# Altium PCB SOM_PCB_BLUETECHNIX.PcbDoc (part 8 of 8)
Units mil, origin at the board's own origin, x right, y up, seen from the top; angles counter-clockwise.
Board outline 1225 x 1620 mil, 8 copper layers (Top Layer, Int1 (Sign), Int2 (GND), Int3 (Sign), Int4 (Sign), Int5 (PWR), Int6 (Sign), Bottom Layer), stack 66.2 mil thick; 65 components, 201 nets, 938 pads, 497 vias.
Unrouted connection lines stored in the file: 25.
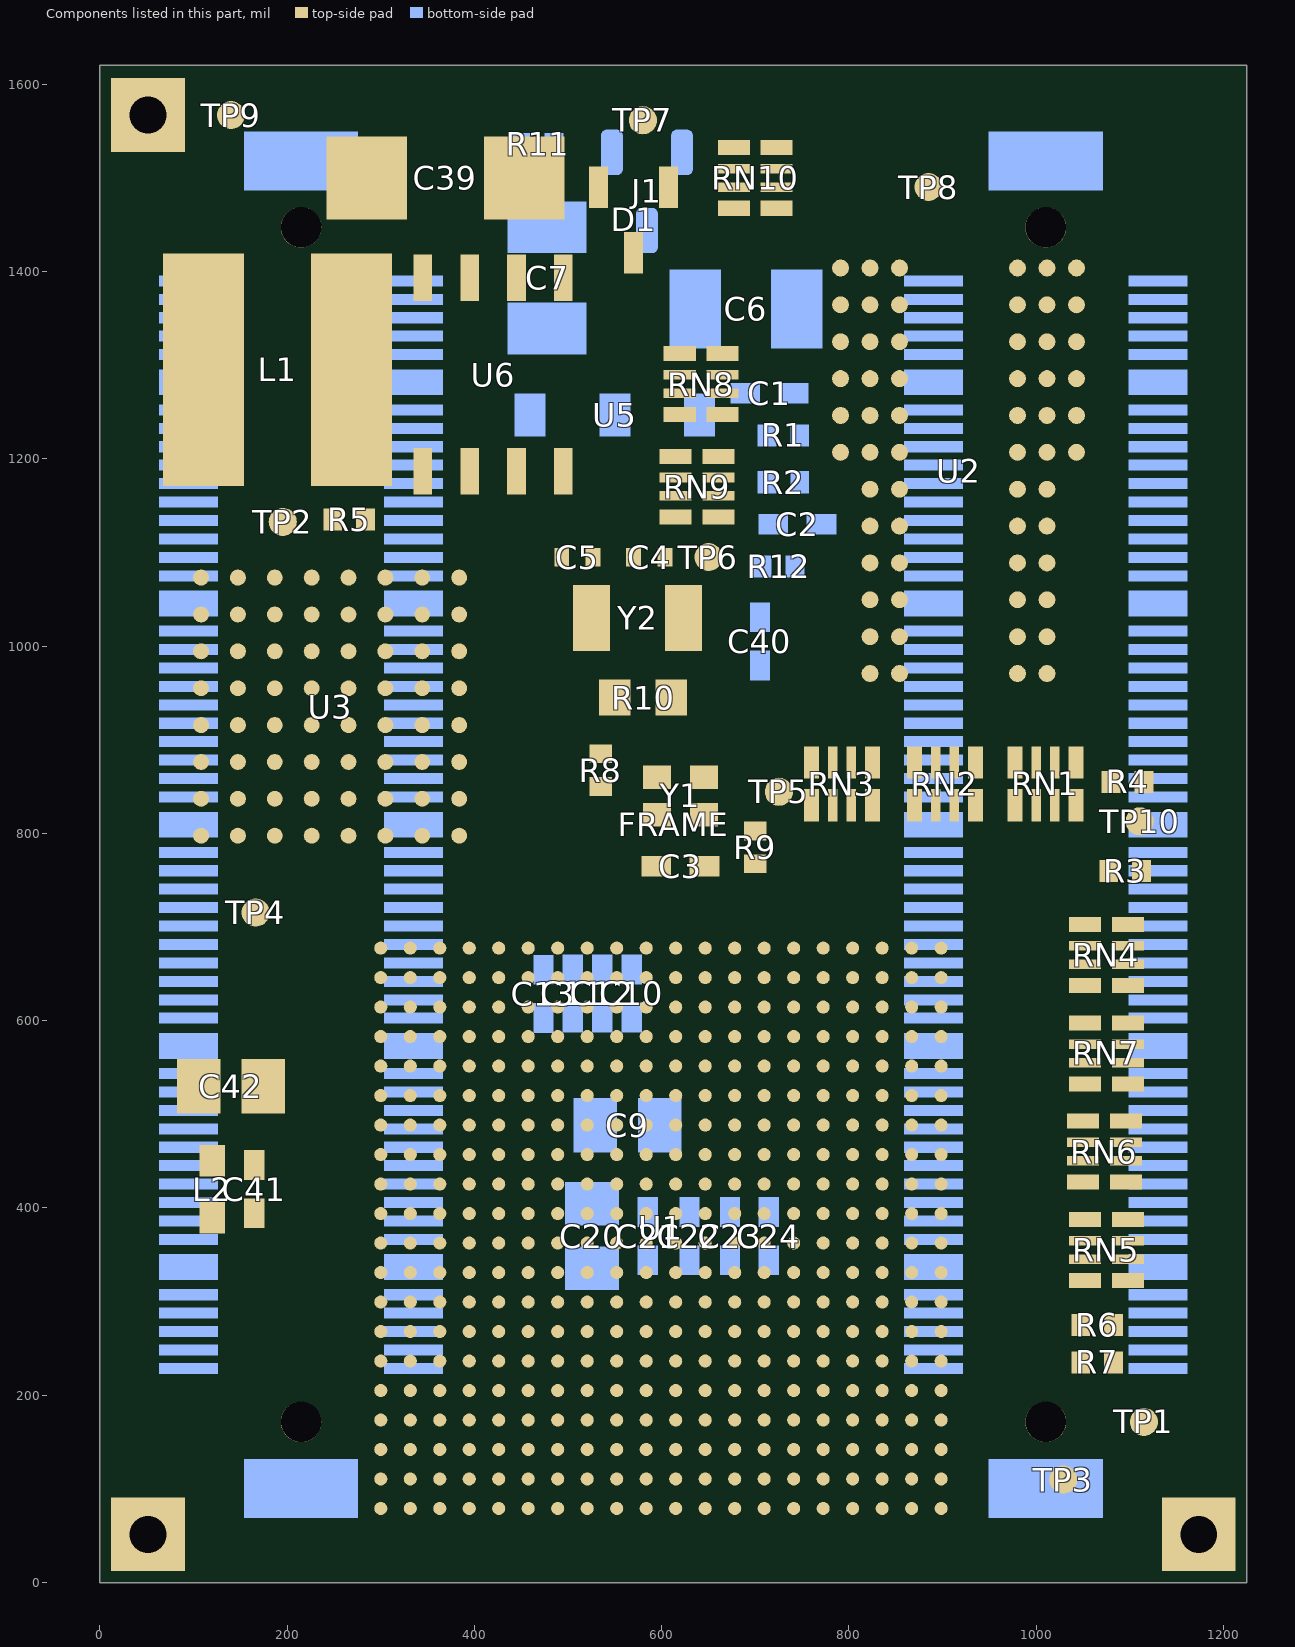
[diagram p13: the components of this part, seen from the top]

## Silkscreen, mask and mechanical layers (free items; w line width, h text height) (continued)
Mechanical 6:
  drawing of 1233 lines, arcs and shapes, not listed
  text "SOM" at -2729.09,10377.81 h49.21
  text "DESIGN INFORMATION" at -4943.23,10377.05 h49.21
  text "BOARD NAME:" at -3463.23,10377.05 h49.21
  text "BOARD TECHNOLOGY" at -4943.23,10277.05 h49.21
  text "BOARD SIZE (REFER ALSO PROFILING INFORMATION)" at -3043.23,10277.05 h49.21
  text "3mil" at -4859.72,10190.88 h49.21
  text "15mil" at -4321.22,10184.07 h49.21
  text "(mm)" at -1460,10181 h49.21
  text "3mil" at -3771.22,10179.07 h49.21
  text "31" at -2752,10176 h49.21
  text "41" at -1962,10176 h49.21
  text "X" at -2308.23,10157.05 h49.21
  text "(MIN. TRACK/   PADS  /   CLEARANCE  IN 0.001'')" at -5003.23,10077.05 h49.21
  text "MINIMUM ANNULAR RING 0.05MM (0.002'') EXTERNAL PER IPC-2221 CLASS 3 LEVEL C AND IS THE" at -4943.23,9977.06 h49.21
  text "MANUFACTURING REGISTRATION ALLOWANCE" at -4943.23,9887.05 h49.21
  text "LAND SIZE CALCULATION MINIMUM - NOMINAL HOLE SIZE + 0.508MM (0.020'')" at -4943.23,9777.05 h49.21
  text "8" at -1271.46,9604.36 h49.21
  text "CIRCUIT TYPE:" at -4943.23,9597.05 h49.21
  text "SS" at -4043.23,9597.05 h49.21
  text "DS" at -3343.23,9597.05 h49.21
  text "X" at -2768.23,9597.05 h49.21
  text "PTH" at -2643.23,9597.05 h49.21
  text "ML" at -2213.23,9597.05 h49.21
  text "X" at -2063.23,9597.05 h49.21
  text "No. of Layers" at -1943.23,9597.05 h49.21
  text "FINGER CONNECTOR DIM PER:" at -4943.23,9477.05 h49.21
  text "AS SHOWN" at -1943.23,9477.05 h49.21
  text "No. OFF TOTAL" at -4283.23,9367.05 h49.21
  text "ONE SIDE" at -2643.23,9367.05 h49.21
  text "BOTH SIDES" at -1943.23,9357.05 h49.21
  text "X" at -3466.38,9255.99 h49.21
  text "X" at -2761.38,9255.99 h49.21
  text "VIAS:" at -4943.23,9252.05 h49.21
  text "NONE" at -4493.23,9252.05 h49.21
  text "FEED THRU'" at -4043.23,9252.05 h49.21
  text "TENTED" at -3343.23,9252.05 h49.21
  text "BURIED LAYER" at -2643.23,9252.05 h49.21
  text "UNIQUE DRILL" at -4043.23,9132.05 h49.21
  text "2 SIZE" at -3343.23,9132.05 h49.21
  text "BLIND LAYER SEQUENCE" at -2643.23,9132.05 h49.21
  text "Layer Stack Manager (PCB)" at -3548.23,9042.05 h49.21
  text "X" at -2063.23,9042.05 h49.21
  text "AS SHOWN" at -1943.23,9042.05 h49.21
  text "LAYER CONSTRUCTION PER:" at -4943.23,9037.05 h49.21
  text "Altium Designer 21" at -1949.57,8932.34 h49.21
  text "ARTWORK:" at -4943.23,8927.05 h49.21
  text "MANUAL" at -4043.23,8927.05 h49.21
  text "DIGITISED" at -3343.23,8927.05 h49.21
  text "X" at -2763.23,8927.05 h49.21
  text "CAD" at -2643.23,8927.05 h49.21
  text "TYPE" at -2213.23,8927.05 h49.21
  text "BURIED LAYER SEQUENCE" at -4933.23,8597.05 h49.21
  text "[1-2], [1-2],[1-3],[1-4],[1-5],[1-6],[1-7],[1-8],[8-7],[8-6],[8-5],[8-4],[8-3],[8-2]" at -4935,8330 h49.21
  text "MATERIAL:" at -4943.23,6236.39 h49.21
  text "GLASS FIBRE EPOXY RESIN NEMA GRADE FR4-08 (IPC-4101) - WITH TG170" at -3933.23,6226.39 h49.21
  text "X" at -4038.23,6221.39 h49.21
  text "THICKNESS:" at -4633.23,6111.39 h49.21
  text "0.8mm" at -3933.23,6111.39 h49.21
  text "1.2mm" at -3238.23,6111.39 h49.21
  text "1.6mm" at -2543.24,6111.41 h49.21
  text "2.4mm" at -1843.23,6111.39 h49.21
  text "3.2mm" at -1143.23,6111.39 h49.21
  text "X" at -2638.23,6106.39 h49.21
  text "2" at -2789.76,5997.42 h49.21
  text "TOLERANCE:" at -4638.23,5991.39 h49.21
  text "OTHER +/-" at -1843.23,5991.39 h49.21
  text "X" at -4038.23,5986.39 h49.21
  text "IN A/W IPC-D-300G CLASS" at -3911.73,5983.52 h49.21
  text "2" at -2789.76,5875.37 h49.21
  text "BOW & TWIST:" at -4638.74,5871.39 h49.21
  text "AS SHOWN" at -1838.23,5866.39 h49.21
  text "IN A/W IPC-D-300G CLASS" at -3911.73,5863.52 h49.21
  text "X" at -4038.23,5861.39 h49.21
  text "COPPER THICKNESS (FINISHED)" at -4734.65,5753.32 h49.21
  text "X" at -2962.06,5656.84 h49.21
  text "X" at -1937.06,5651.84 h49.21
  text "18um" at -3933.23,5651.39 h49.21
  text "35um" at -2868.23,5651.39 h49.21
  text "70um" at -1833.23,5651.39 h49.21
  text "OUTER:" at -4592.91,5647.02 h49.21
  text "INNER SIGNAL:" at -4734.65,5536.79 h49.21
  text "18um" at -3933.23,5531.39 h49.21
  text "35um" at -2868.23,5531.39 h49.21
  text "70um" at -1833.23,5531.39 h49.21
  text "X" at -2971,5528 h49.21
  text "INNER PWR:" at -4592.91,5410.8 h49.21
  text "18um" at -3933.23,5411.39 h49.21
  text "35um" at -2868.23,5411.39 h49.21
  text "70um" at -1833.23,5411.39 h49.21
  text "X" at -2971,5410 h49.21
  text "STRUCTURE:" at -4943.23,5291.39 h49.21
  text "REFER" at -3933.23,5291.39 h49.21
  text "AS PER DRAWING No." at -3938.23,5166.39 h49.21
  text "AS SHOWN" at -1838.23,5166.39 h49.21
  text "DRILLING:" at -4943.23,5056.39 h49.21
  text "COMPONENT SIDE" at -3933.23,4966.39 h49.21
  text "SOLDER SIDE" at -2878.23,4966.39 h49.21
  text "VIEWED FROM:" at -4667.72,4958.05 h49.21
  text "X" at -4038.23,4956.39 h49.21
  text "REFERENCE:" at -4658.23,4846.39 h49.21
  text "AS SHOWN" at -3938.23,4841.39 h49.21
  text "PATTERN MASTER LIST" at -2873.23,4841.39 h49.21
  text "X" at -1938.23,4841.39 h49.21
  text "NC_DRILL FILES" at -1838.23,4841.39 h49.21
  text "X" at -4038.23,4836.39 h49.21
  text "20um" at -2868.23,4726.39 h49.21
  text "PTH MINIMUM COPPER THICKNESS:" at -4655.91,4721.83 h49.21
  text "X" at -2973.23,4721.39 h49.21
  text "OTHER" at -1838.23,4721.39 h49.21
  text "NPTH:" at -4659.84,4607.65 h49.21
  text "TENTED" at -3938.23,4601.39 h49.21
  text "X" at -2973.23,4601.39 h49.21
  text "PADS REMOVED" at -2873.23,4601.39 h49.21
  text "REMOVE PADS" at -1838.23,4601.39 h49.21
  text "X" at -4038.23,4596.39 h49.21
  text "2nd DRILL" at -3938.23,4481.39 h49.21
  text "BOTH" at -2873.23,4481.39 h49.21
  text "AS SHOWN" at -2388.23,4481.39 h49.21
  text "NONE" at -1838.23,4481.39 h49.21
  text "BOARD FINISH:" at -4943.23,4366.39 h49.21
  text "X" at -4038.23,4361.39 h49.21
  text "ETCHING" at -3938.23,4361.39 h49.21
  text "REFER PATTERN MASTER LIST" at -2873.23,4361.39 h49.21
  text "LEGEND / SCREEN PRINT:" at -4927.13,4250 h49.21
  text "NONE" at -3604.65,4245.76 h49.21
  text "COMPONENT" at -2873.35,4244.39 h49.21
  text "SOLDER" at -1836.93,4241.83 h49.21
  text "X" at -2973.35,4239.39 h49.21
  text "X" at -1936.93,4236.83 h49.21
  text "WHITE" at -3935.35,4131.59 h49.21
  text "COLOUR:" at -4459.06,4127.34 h49.21
  text "X" at -4035.35,4126.59 h49.21
  text "YELLOW" at -2873.23,4121.39 h49.21
  text "OTHER" at -1838.23,4121.39 h49.21
  text "SOLDER RESIST:" at -4699.21,4001.35 h49.21
  text "X" at -4038.23,4001.39 h49.21
  text "LIQUID PHOTOIMAGEABLE" at -3938.23,4001.39 h49.21
  text "SCREEN PRINT" at -2388.23,4001.39 h49.21
  text "FINISH:" at -4447.24,3883.24 h49.21
  text "MATTE" at -3938.23,3881.39 h49.21
  text "GLOSS" at -3438.23,3881.39 h49.21
  text "X" at -3543.23,3876.39 h49.21
  text "COLOUR:" at -4459.06,3765.13 h49.21
  text "BLACK" at -3938.23,3761.39 h49.21
  text "GREEN" at -3438.23,3761.39 h49.21
  text "YELLOW" at -2873.23,3761.39 h49.21
  text "BLUE" at -2388.23,3761.39 h49.21
  text "OTHER" at -1838.23,3761.39 h49.21
  text "X" at -4043.23,3756.39 h49.21
  text "TRACK FINISH:" at -4943.23,3646.39 h49.21
  text "SELECTIVE SOLDER (HASL)" at -3938.23,3641.39 h49.21
  text "REFLOW SOLDER" at -2388.23,3641.39 h49.21
  text "0.1um - 0.2um ELECTROLESS GOLD OVER 3um NICKEL" at -3935.43,3528.91 h49.21
  text "X" at -4037.8,3524.98 h49.21
  text "IMMERSION GOLD" at -3938.23,3401.39 h49.21
  text "OTHER" at -2388.23,3401.39 h49.21
  text "EDGE BOARD" at -4943.23,3286.39 h49.21
  text "1.3um HARD GOLD OVER 5um     NICKEL / TIN-NICKEL" at -3938.23,3281.39 h49.21
  text "CONTACTS:" at -4943.23,3201.39 h49.21
  text "HARD FINISH GOLDE PLATE" at -3938.23,3161.39 h49.21
  text "OTHER" at -2388.23,3161.39 h49.21
  text "AS SHOWN" at -3938.23,3041.39 h49.21
  text "REFER" at -2388.23,3041.39 h49.21
  text "PROFILING:" at -4943.23,2921.39 h49.21
  text "AS DIMENSIONED, MEASURED AND CUT FROM SPECIFIED DATUM." at -3938.23,2921.39 h49.21
  text "X" at -4038.23,2916.39 h49.21
  text "REFER PCB BLANK DWG No." at -3933.23,2806.39 h49.21
  text "USE PROFILE / ROUTE TAPE SUPPLIED (REFER PATTERN MASTER LIST)" at -3933.23,2686.39 h49.21
  text "Layer" at 1767.5,2570 h60
  text "Name" at 2177.41,2570 h60
  text "Material" at 3507.03,2570 h60
  text "Thickness" at 4066.89,2570 h60
  text "Constant" at 4716.73,2570 h60
  text "Board Layer Stack" at 5286.59,2570 h60
  text "X" at -2644.09,2568.28 h49.21
  text "SQUARE CUT" at -3933.23,2566.39 h49.21
  text "N.C. ROUTE" at -3233.23,2566.39 h49.21
  text "V. SCORE" at -2533.23,2566.39 h49.21
  text "BLANK" at -1833.23,2566.39 h49.21
  text "ACCEPTABILITY:" at -4943.23,2461.39 h49.21
  text "MATERIALS AND WORKMANSHIP FOR ALL PRINTED WIRING BOARDS TO MEET" at -4068.23,2456.39 h49.21
  text "Top Overlay" at 2177.41,2450 h60
  text "OR EXCEED THE REQUIREMENTS OF:" at -4068.23,2346.39 h49.21
  text "Top Solder" at 2177.41,2330 h60
  text "SM-001" at 3507.03,2330 h60
  text "1.00mil" at 4066.89,2330 h60
  text "4" at 4716.73,2330 h60
  text "IPC-6011/12 AND IPC-A-600E" at -3928.23,2241.39 h49.21
  text "1" at -2528.23,2241.39 h49.21
  text "2" at -2178.23,2241.39 h49.21
  text "3" at -1827.99,2238.95 h49.21
  text "X" at -2283.23,2236.39 h49.21
  text "X" at -4033.23,2231.39 h49.21
  text "Top Surface Finish" at 2177.41,2210 h60
  text "PbSn" at 3507.03,2210 h60
  text "0.79mil" at 4066.89,2210 h60
  text "UL CERTIFICATION" at -3928.23,2121.39 h49.21
  text "AUSTEL" at -2528.23,2121.39 h49.21
  text "X" at -4033.23,2116.39 h49.21
  text "1" at 1767.5,2090 h60
  text "Top Layer" at 2177.41,2090 h60
  text "CF-004" at 3507.03,2090 h60
  text "1.40mil" at 4066.89,2090 h60
  text "ML-P-55110F GRP" at -3948.23,2001.39 h49.21
  text "A" at -3228.23,2001.39 h49.21
  text "B" at -2878.23,2001.39 h49.21
  text "AS2546" at -2528.23,2001.39 h49.21
  text "OTHER" at -1828.23,2001.39 h49.21
  text "Dielectric 1" at 2177.41,1970 h60
  text "FR4" at 3507.03,1970 h60
  text "7.00mil" at 4066.89,1970 h60
  text "4.8" at 4716.73,1970 h60
  text "ADDITIONAL REQUIREMENTS:" at -4951.18,1871.43 h49.21
  text "2" at 1767.5,1850 h60
  text "Int1 (Sign)" at 2177.41,1850 h60
  text "CF-004" at 3507.03,1850 h60
  text "1.40mil" at 4066.89,1850 h60
  text "NONE" at -3929.57,1769.94 h49.21
  text "SAMPLE PLAN" at -3229.57,1769.94 h49.21
  text "MIL-P-55110E SERIAL Nos. PER ORDER" at -2450.83,1769.94 h49.21
  text "X" at -4035.83,1769.35 h49.21
  text "MICROSECTION:" at -4746.46,1765.13 h49.21
  text "Dielectric 3" at 2177.41,1730 h60
  text "FR4" at 3507.03,1730 h60
  text "9.00mil" at 4066.89,1730 h60
  text "4.8" at 4716.73,1730 h60
  text "NONE" at -3925.83,1644.42 h49.21
  text "CERTIFICATION:" at -4750.39,1639.15 h49.21
  text "A" at -2452.64,1635.25 h49.21
  text "MIL-P-55110E GRP" at -3233.9,1633.28 h49.21
  text "B" at -2241.38,1632.14 h49.21
  text "1" at -1268.94,1628.2 h49.21
  text "2" at -1057.68,1625.09 h49.21
  text "3" at -841.14,1625.09 h49.21
  text "IPC CLASS:" at -1836.26,1621.47 h49.21
  text "3" at 1767.5,1610 h60
  text "Int2 (GND)" at 2177.41,1610 h60
  text "CF-004" at 3507.03,1610 h60
  text "1.40mil" at 4066.89,1610 h60
  text "RoHS Compliant" at -3925.83,1518.44 h49.21
  text "X" at -4035.83,1513.44 h49.21
  text "X" at -3337.48,1509.94 h49.21
  text "QUALITY RELEASE REPORT" at -3233.9,1507.3 h49.21
  text "OTHER" at -1832.17,1505.33 h49.21
  text "Dielectric 4" at 2177.41,1490 h60
  text "FR4" at 3507.03,1490 h60
  text "7.00mil" at 4066.89,1490 h60
  text "4.8" at 4716.73,1490 h60
  text "NONE" at -3927.99,1391.98 h49.21
  text "REQUIRED (100% PADS & NETS)" at -3227.99,1391.98 h49.21
  text "PER ORDER" at -1824.06,1388.05 h49.21
  text "ELECTRICAL TEST:" at -4750.39,1387.18 h49.21
  text "X" at -3332.99,1386.98 h49.21
  text "4" at 1767.5,1370 h60
  text "Int3 (Sign)" at 2177.41,1370 h60
  text "CF-004" at 3507.03,1370 h60
  text "1.40mil" at 4066.89,1370 h60
  text "2 SIDES" at -2465.16,1266.51 h49.21
  text "MIN. PITCH" at -1831.93,1266.51 h49.21
  text "0.6mm" at -1296.93,1266.51 h49.21
  text "NONE" at -3927.99,1266 h49.21
  text "1 SIDE" at -3232.99,1266 h49.21
  text "SURFACE MOUNT:" at -4754.33,1261.2 h49.21
  text "X" at -2553.15,1258.52 h49.21
  text "Dielectric 6" at 2177.41,1250 h60
  text "FR4" at 3507.03,1250 h60
  text "9.00mil" at 4066.89,1250 h60
  text "4.8" at 4716.73,1250 h60
  text "FOIL" at -2449.25,1142.38 h49.21
  text "Bottom Overlay" at -1313.15,1138.99 h49.21
  text "NONE" at -3227.99,1138.44 h49.21
  text "LEGEND" at -2105.55,1138.44 h49.21
  text "REFER" at -1632.99,1138.44 h49.21
  text "X" at -3326.5,1136.91 h49.21
  text "X" at -1739.06,1136.91 h49.21
  text "5" at 1767.5,1130 h60
  text "Int4 (Sign)" at 2177.41,1130 h60
  text "CF-004" at 3507.03,1130 h60
  text "1.40mil" at 4066.89,1130 h60
  text "MANUFACTURER'S ID/LOGO:" at -4754.33,1127.34 h49.21
  text "NONE" at -2447.24,1017.1 h49.21
  text "ISO9001/AS3901" at -3227.2,1010.09 h49.21
  text "Dielectric 8" at 2177.41,1010 h60
  text "FR4" at 3507.03,1010 h60
  text "7.00mil" at 4066.89,1010 h60
  text "4.8" at 4716.73,1010 h60
  text "MANUFACTURER'S ACCREDITATION:" at -4754.33,1005.29 h49.21
  text "X" at -3332.2,1005.09 h49.21
  text "PACKAGING AND HANDLING:" at -4754.33,895.06 h49.21
  text "6" at 1767.5,890 h60
  text "Int5 (PWR)" at 2177.41,890 h60
  text "CF-004" at 3507.03,890 h60
  text "1.40mil" at 4066.89,890 h60
  text "REFER" at -2449.25,886.63 h49.21
  text "PER ORDER" at -3227.99,882.69 h49.21
  text "X" at -3332.99,872.69 h49.21
  text "Dielectric 9" at 2177.41,770 h60
  text "FR4" at 3507.03,770 h60
  text "9.00mil" at 4066.89,770 h60
  text "4.8" at 4716.73,770 h60
  text "7" at 1767.5,650 h60
  text "Int6 (Sign)" at 2177.41,650 h60
  text "CF-004" at 3507.03,650 h60
  text "1.40mil" at 4066.89,650 h60
  text "Notes" at -5053.54,580.09 h49.21
  text "Dielectric 11" at 2177.41,530 h60
  text "FR4" at 3507.03,530 h60
  text "7.00mil" at 4066.89,530 h60
  text "4.8" at 4716.73,530 h60
  text "8" at 1767.5,410 h60
  text "Bottom Layer" at 2177.41,410 h60
  text "CF-004" at 3507.03,410 h60
  text "1.40mil" at 4066.89,410 h60
  text "1.Dimensions are in mm except specifically specified as mil." at -4987.8,350.57 h49.21
  text "Bottom Surface Finish" at 2177.41,290 h60
  text "PbSn" at 3507.03,290 h60
  text "0.79mil" at 4066.89,290 h60
  text "Bottom Solder" at 2177.41,170 h60
  text "SM-001" at 3507.03,170 h60
  text "1.00mil" at 4066.89,170 h60
  text "4" at 4716.73,170 h60
  text "2. The router cutter diameter is 1.2mm." at -5000,151 h49.21
  text "Bottom Overlay" at 2177.41,50 h60
  text "3. Impedance control traces on Top Layer (90ohm differential) for 8mil trace." at -4990,-19 h49.21
  text "Total board thickness:" at 1767.5,-70 h60
  text "69.77mil" at 4066.89,-70 h60
  text "4. This assembly has plated edges (Sideplating)." at -4984,-188 h49.21
Drill Drawing:
  circle w10: c-4907.28,-881.67 r33.33
  lines w10: -4940.61,-1348.33 -4923.94,-1348.33 -4923.94,-1365 -4890.61,-1365 -4890.61,-1348.33 -4873.94,-1348.33 -4873.94,-1315 -4890.61,-1315 -4890.61,-1298.33 -4923.94,-1298.33 -4923.94,-1315 -4940.61,-1315 -4940.61,-1348.33 ; -4940.61,-1198.33 -4923.94,-1198.33 -4907.28,-1215 -4890.61,-1198.33 -4873.94,-1198.33 -4890.61,-1181.67 -4873.94,-1165 -4890.61,-1165 -4907.28,-1148.33 -4923.94,-1165 -4940.61,-1165 -4923.94,-1181.67 -4940.61,-1198.33 ; -4940.61,-998.33 -4873.94,-998.33 -4907.28,-1065 -4940.61,-998.33 ; -4940.61,-765 -4907.28,-748.33 -4873.94,-765 -4890.61,-731.67 -4873.94,-698.33 -4907.28,-715 -4940.61,-698.33 -4923.94,-731.67 -4940.61,-765 ; -4940.61,-615 -4873.94,-615 -4873.94,-548.33 -4940.61,-548.33 -4940.61,-615
  lines w15: -5000.4,-1410 5530.68,-1410 ; -5000.4,-510 5530.68,-510 ; -4449.52,-1560 -4449.52,-360 ; -3849.68,-1560 -3849.68,-360 ; -2760,-1560 -2760,-360 ; -2254.12,-1560 -2254.12,-360 ; -1520.32,-1560 -1520.32,-360 ; -20.77,-1560 -20.77,-360 ; 569.08,-1560 569.08,-360 ; 1314.88,-1560 1314.88,-360 ; 1964.7,-1560 1964.7,-360 ; 2818.47,-1560 2818.47,-360 ; 4152.08,-1560 4152.08,-360 ; -5000.4,-1560 5530.68,-1560 5530.68,-360 -5000.4,-360 -5000.4,-1560
  text "Symbol" at -4910.4,-465 h72
  text "Count" at -4404.52,-465 h72
  text "Hole Size" at -3804.68,-465 h72
  text "Plated" at -2715,-465 h72
  text "Hole Type" at -2209.12,-465 h72
  text "Drill Layer Pair" at -1475.32,-465 h72
  text "Via/Pad" at 24.23,-465 h72
  text "Pad Shape" at 614.08,-465 h72
  text "Template" at 1359.88,-465 h72
  text "Description" at 2009.7,-465 h72
  text "Hole Tolerance (+)" at 2863.47,-465 h72
  text "Hole Tolerance (-)" at 4197.08,-465 h72
  text "3" at -4404.52,-615 h60
  text "39.37mil (1.000mm)" at -3804.68,-615 h60
  text "PTH" at -2715,-615 h60
  text "Round" at -2209.12,-615 h60
  text "Top Layer - Bottom Layer" at -1475.32,-615 h60
  text "Pad" at 24.23,-615 h60
  text "Rectangle" at 614.08,-615 h60
  text "s200h100" at 1359.88,-615 h60
  text "4" at -4404.52,-765 h60
  text "7.00mil (0.178mm)" at -3804.68,-765 h60
  text "PTH" at -2715,-765 h60
  text "Round" at -2209.12,-765 h60
  text "Top Layer - Int1 (Sign)" at -1475.32,-765 h60
  text "Via" at 24.23,-765 h60
  text "Rounded" at 614.08,-765 h60
  text "v25h18m0" at 1359.88,-765 h60
  text "4" at -4404.52,-915 h60
  text "43.31mil (1.100mm)" at -3804.68,-915 h60
  text "NPTH" at -2715,-915 h60
  text "Round" at -2209.12,-915 h60
  text "Top Layer - Bottom Layer" at -1475.32,-915 h60
  text "Pad" at 24.23,-915 h60
  text "Rounded" at 614.08,-915 h60
  text "c110hn110" at 1359.88,-915 h60
  text "106" at -4404.52,-1065 h60
  text "12.00mil (0.305mm)" at -3804.68,-1065 h60
  text "PTH" at -2715,-1065 h60
  text "Round" at -2209.12,-1065 h60
  text "(Mixed)" at -1475.32,-1065 h60
  text "Via" at 24.23,-1065 h60
  text "Rounded" at 614.08,-1065 h60
  text "(Mixed)" at 1359.88,-1065 h60
  text "168" at -4404.52,-1215 h60
  text "8.00mil (0.203mm)" at -3804.68,-1215 h60
  text "PTH" at -2715,-1215 h60
  text "Round" at -2209.12,-1215 h60
  text "(Mixed)" at -1475.32,-1215 h60
  text "Via" at 24.23,-1215 h60
  text "Rounded" at 614.08,-1215 h60
  text "(Mixed)" at 1359.88,-1215 h60
  text "219" at -4404.52,-1365 h60
  text "10.00mil (0.254mm)" at -3804.68,-1365 h60
  text "PTH" at -2715,-1365 h60
  text "Round" at -2209.12,-1365 h60
  text "(Mixed)" at -1475.32,-1365 h60
  text "Via" at 24.23,-1365 h60
  text "Rounded" at 614.08,-1365 h60
  text "(Mixed)" at 1359.88,-1365 h60
  text "504 Total" at -4404.52,-1515 h60

## Text inside footprints (layer, text, board x,y; h text height)
U2: Top Overlay "1" at 807.01,1417.2 h50 r90; Top Overlay "A" at 722.01,1372.2 h50
U6: Top Overlay "*" at 465,1370 h50 r270; Mechanical 13 "*" at 465.5,1366 h50 r270